# Altium PCB RADAR_D79_POWER_24V_v0.9.3.37_R10_3_37_REZONIT_IMPEDANCE_RECALC_NATIVE.PcbDoc (part 7 of 9)
Units mil, origin at the board's own origin, x right, y up, seen from the top; angles counter-clockwise.
Board outline 3110.24 x 3110.24 mil, 10 copper layers (Top Layer, RF_GND, SIG_A0, SIG_A1, PWR_A, PWR_B, SIG_B1, SIG_B0, DIGITAL_GND, Bottom Layer), stack 80.001 mil thick; 304 components, 269 nets, 1408 pads, 1372 vias.
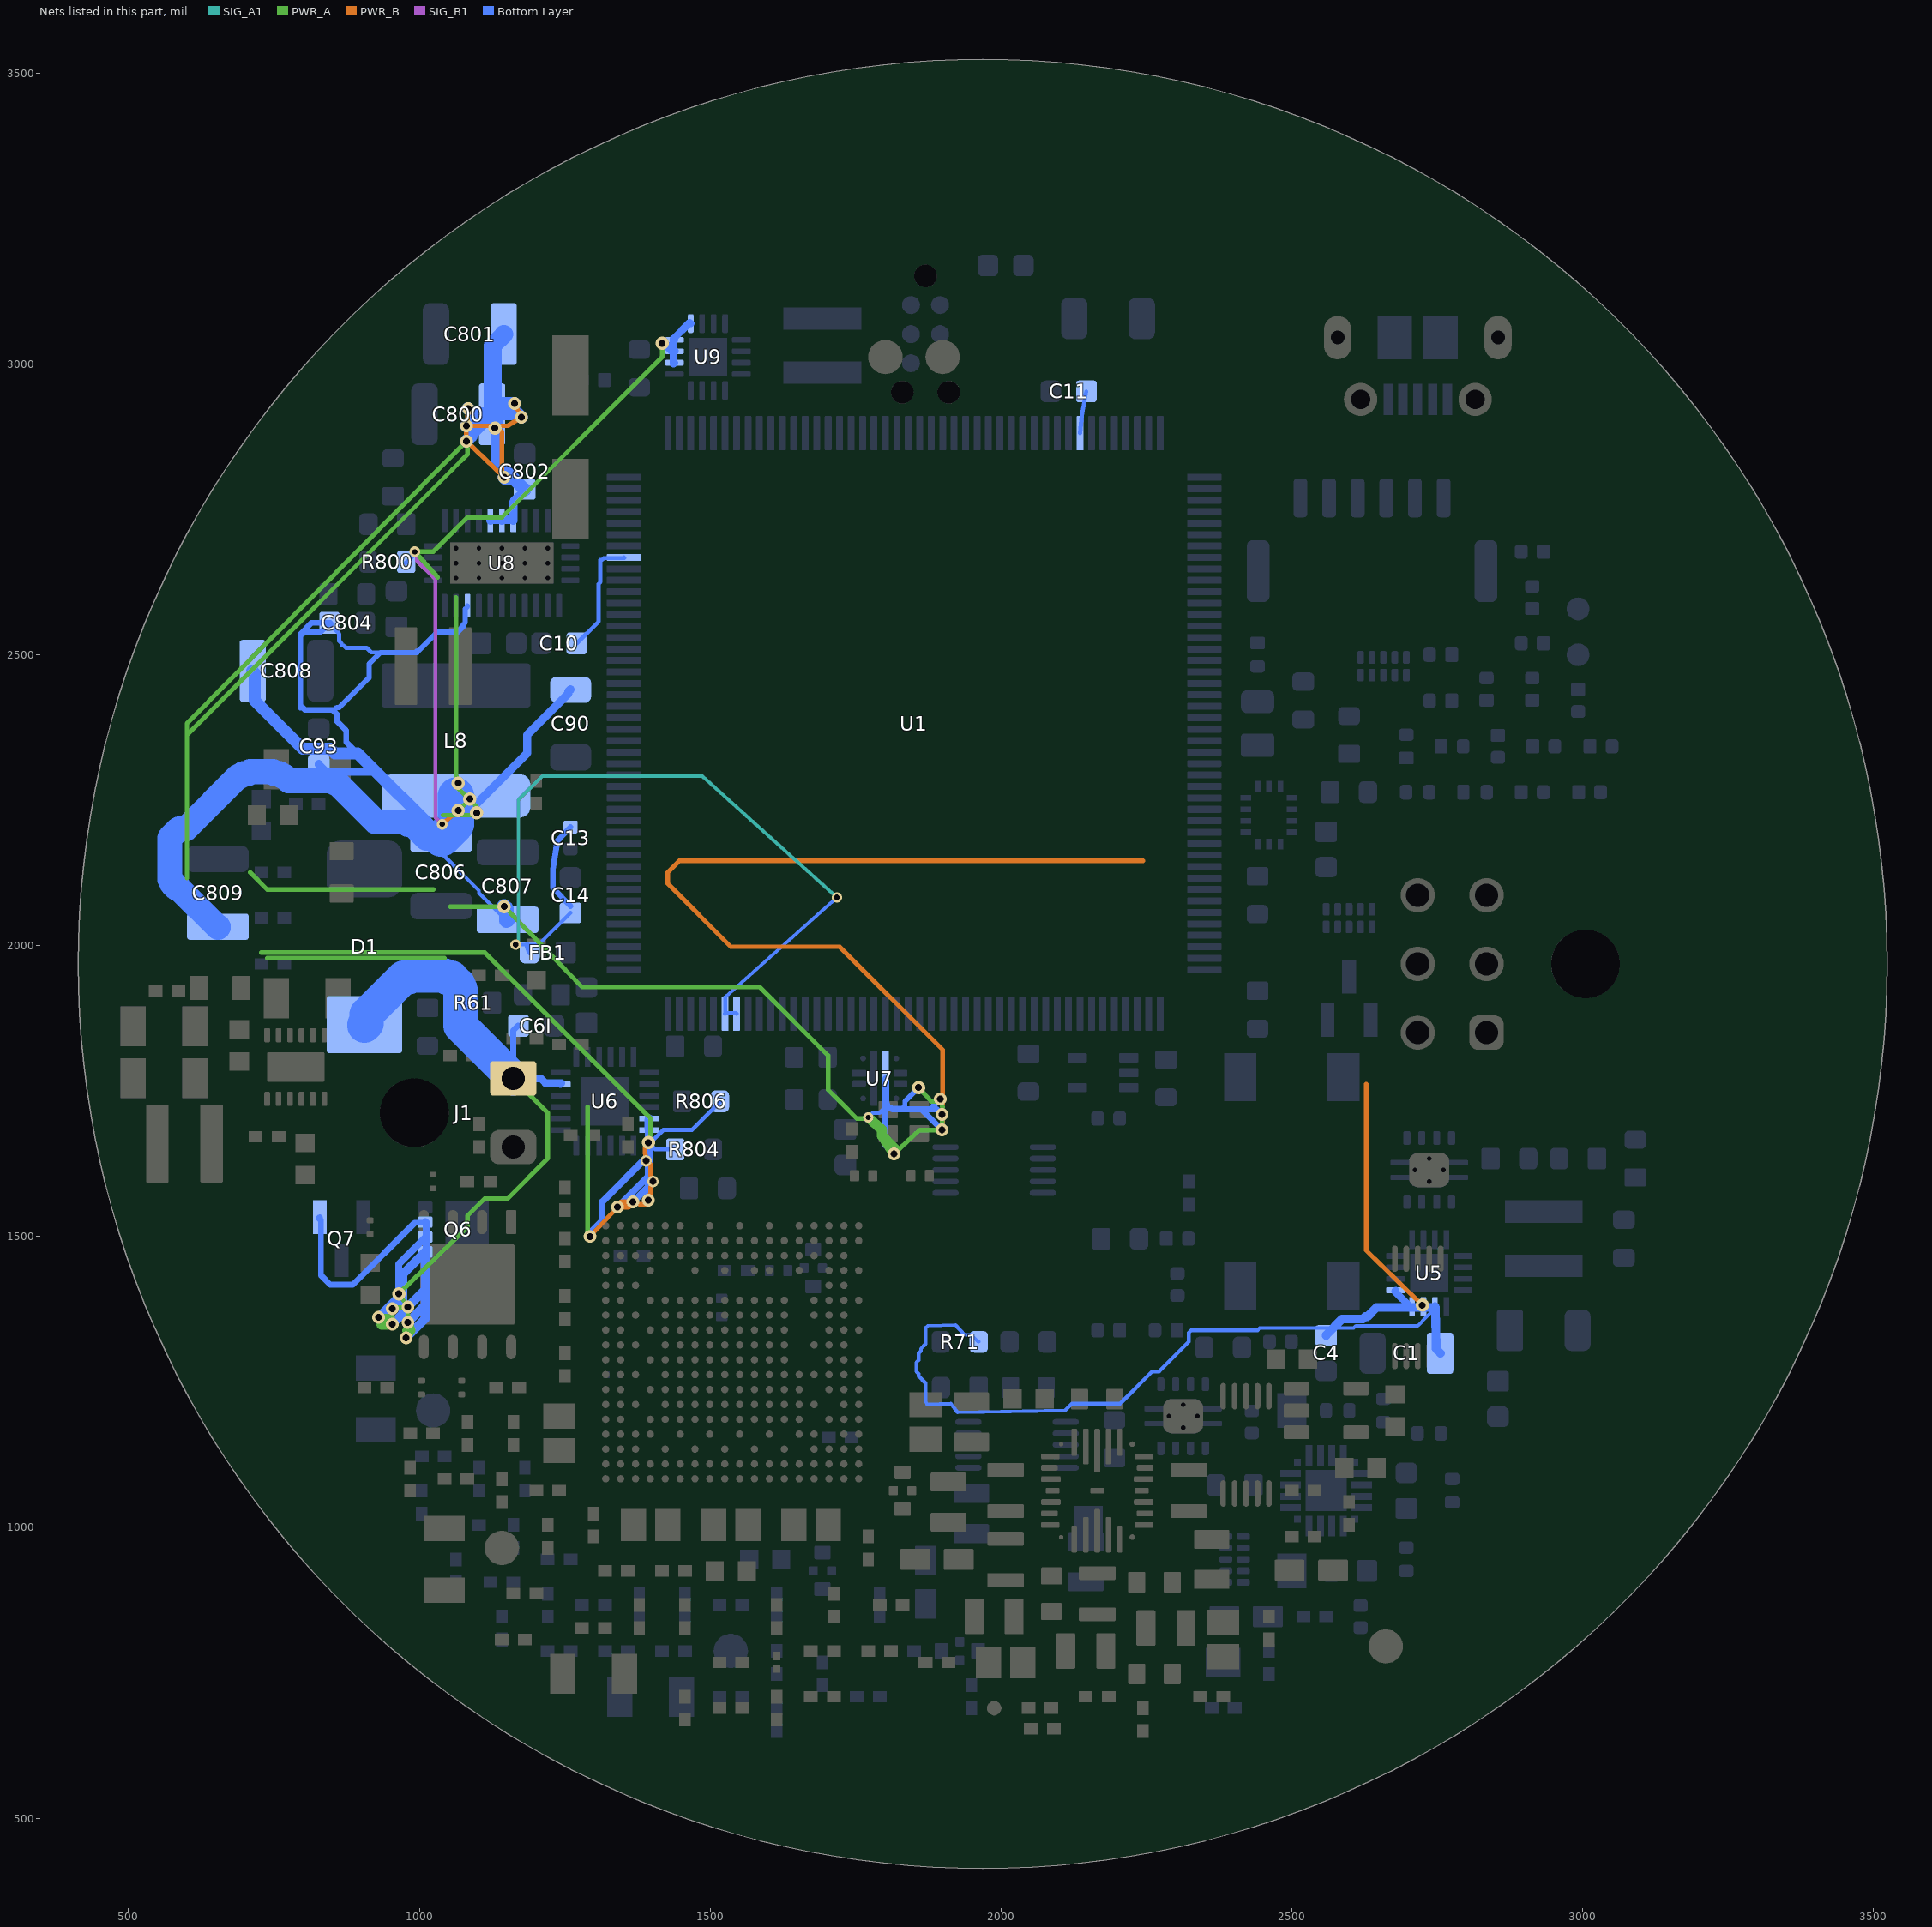
[diagram p15: the nets of this part, all layers, seen from the top]

## Via types
v1: diameter 13.77, hole 5.9, Top Layer to SIG_A0, tented both sides, 393 vias
v2: diameter 17.72, hole 9.84, Top Layer to Bottom Layer, tented both sides, 188 vias
v3: diameter 13.77/13.77/13.77 (per signal layer), hole 5.9, Top Layer to SIG_A0, tented both sides, 120 vias
v4: diameter 13.77, hole 5.9, Top Layer to SIG_A0, tented top, 104 vias
v5: diameter 19.68, hole 9.84, Top Layer to Bottom Layer, 103 vias
v6: diameter 19.68, hole 9.84, Top Layer to Bottom Layer, tented both sides, 93 vias
v7: diameter 13.78, hole 5.91, Top Layer to SIG_A0, tented both sides, 83 vias
v8: diameter 13.78, hole 5.91, SIG_B0 to Bottom Layer, tented both sides, 74 vias
v9: diameter 13.78, hole 5.91, Top Layer to SIG_A0, tented bottom, 55 vias
v10: diameter 13.78, hole 5.91, SIG_B0 to Bottom Layer, tented top, 43 vias
v11: diameter 16.54, hole 7.87, SIG_B0 to Bottom Layer, tented both sides, 22 vias
v12: diameter 22.05, hole 11.81, Top Layer to Bottom Layer, tented both sides, 17 vias
v13: diameter 17.72, hole 9.84, Top Layer to Bottom Layer, 14 vias
v14: diameter 16.54, hole 7.87, Top Layer to Bottom Layer, tented both sides, 11 vias
v15: diameter 18.11, hole 9.06, Top Layer to Bottom Layer, 7 vias
v16: diameter 22.83, hole 11.81, Top Layer to Bottom Layer, 6 vias
v17: diameter 22.05, hole 11.81, Top Layer to Bottom Layer, 6 vias
v18: diameter 22.83, hole 11.81, Top Layer to Bottom Layer, tented both sides, 5 vias
v19: diameter 17.32, hole 8.66, Top Layer to Bottom Layer, 3 vias
v20: diameter 20.47, hole 9.84, Top Layer to Bottom Layer, 3 vias
v21: diameter 16.54, hole 7.87, Top Layer to Bottom Layer, 3 vias
v22: diameter 22.05, hole 11.02, Top Layer to Bottom Layer, 2 vias
v23: diameter 19.68, hole 11.81, Top Layer to Bottom Layer, 2 vias
v24: diameter 19.68, hole 9.84, SIG_A1 to Bottom Layer, 2 vias
v25: diameter 16.54, hole 7.87, SIG_A1 to SIG_B1, tented both sides, 2 vias
v26: diameter 16.54, hole 7.87, Top Layer to SIG_A1, 2 vias
v27: diameter 13.78, hole 5.91, Top Layer to SIG_A0, 2 vias
v28: diameter 18, hole 9.84, Top Layer to Bottom Layer, tented both sides, 1 vias
v29: diameter 18.11, hole 9.06, Top Layer to Bottom Layer, tented both sides, 1 vias
v30: diameter 19.68, hole 9.84, SIG_B0 to Bottom Layer, tented both sides, 1 vias
v31: diameter 17.32, hole 7.87, Top Layer to Bottom Layer, tented both sides, 1 vias
v32: diameter 17.32, hole 7.87, SIG_A1 to Bottom Layer, tented both sides, 1 vias
v33: diameter 19.68, hole 9.84, SIG_B1 to Bottom Layer, 1 vias
v34: diameter 16.54, hole 7.87, SIG_A0 to PWR_B, tented both sides, 1 vias

## Nets (pads, with @x,y where several pads share a name; then routed paths per layer and width w, separated by ;. In a path a pad name is that pad's centre, name@x,y a point inside that pad or via, vN(x,y) a via of type N, cw(c..) or ccw(c..) an arc to the next point about the centre after c; other vN are vias at no path point) (continued)
V12_SYS: C1.1 C4.1 C90.1 C93.1 C804.1 C806.1 C807.1 C808.1 C809.1 L8.2 R71.1 R800.1 U5.10 U5.11 U5.12 U5.13 U7.5 U8.9 U9.10 U9.11 U9.12 U9.13 | length 11451.6
  PWR_A w7.87: 708.66,2125.98 738.19,2096.46 1023.62,2096.46 ; 1031.63,2633.27 v15(992.13,2677.17) 1023.62,2677.17 1043.11,2696.65 1082.68,2736.22 1141.73,2736.22 1392.27,2986.76 1417.32,3011.81 v16(1417.32,3035.43) ; 1040.56,2224.41 1092.52,2224.41 v18(1098.43,2228.35) 1102.36,2234.25 v18(1086.61,2251.97) ; 1053.15,2066.93 1086.61,2066.93 v16(1145.67,2066.93) 1186.82,2024.57 1279.53,1929.13 1584.65,1929.13 1702.76,1811.02 1702.76,1751.97 1724.27,1730.46 1751.97,1702.76 1761.81,1702.76 v15(1771.65,1704.72) 1820.87,1653.54 v17(1815.94,1641.73) 1860.24,1683.07 v12(1898.62,1683.07) v12(1898.62,1709.65) 1899.61,1722.44 v12(1895.67,1736.22) 1889.76,1732.28 1879.92,1732.28 v16(1858.27,1755.91) ; 1062.99,2598.43 1062.99,2338.03 1062.99,2293.31 v16(1066.93,2279.53) 1062.99,2273.62 v18(1086.61,2251.97) ; v18(1066.93,2232.28) v18(1086.61,2251.97)
  PWR_A w17.72: v15(1771.65,1704.72) 1795.28,1683.07 1795.28,1673.23 v17(1815.94,1641.73)
  PWR_B w7.87: v29(1039.37,2208.66) v18(1066.93,2232.28) ; v12(1898.62,1683.07) 1899.61,1692.91 1899.61,1742.08 1899.61,1820.87 1722.44,1998.03 1535.43,1998.03 1427.17,2106.3 1427.17,2125.98 1446.85,2145.67 2244.09,2145.67 ; 2627.95,1761.81 2627.95,1476.38 2682.22,1423.22 v18(2724.41,1381.89)
  SIG_B1 w7.09: v15(992.13,2677.17) 996.06,2673.23 996.06,2661.42 1027.56,2629.92 1027.56,2220.47 v29(1039.37,2208.66)
  Bottom Layer w6.3: C806.1@1037.4,2184.06 1039.37,2185.04 1039.37,2157.48 1102.36,2094.49 1102.36,2090.55 1149.61,2043.31 C807.1@1151.57,2044.29 ; R71.1@1961.61,1318.9 1960.63,1318.9 1948.82,1330.71 1937.01,1330.71 1921.59,1347.74 1874.02,1346.46 1870.08,1342.52 1870.08,1314.96 1862.2,1307.09 1862.2,1303.15 1858.27,1299.21 1858.27,1287.4 1854.33,1283.46 1854.33,1267.72 1858.27,1263.78 1858.27,1259.84 1870.08,1248.03 1870.08,1216.54 1872.96,1211.07 1913.39,1212.6 1925.2,1197.44 2110.24,1200.79 2122.05,1212.6 2204.72,1212.6 2259.84,1267.72 2271.65,1267.72 2322.83,1318.9 2322.83,1334.65 2326.77,1338.58 2440.94,1338.58 2444.88,1342.52 2606.3,1342.52 2610.24,1346.46 2716.54,1346.46 2747.09,1377.95 U5.10@2746.06,1379.43
  Bottom Layer w7.09: C804.1@845.47,2555.12 846.46,2555.12 850.39,2551.18 850.39,2547.24 862.2,2535.43 862.2,2523.62 866.14,2519.68 866.14,2515.75 870.08,2515.75 874.02,2511.81 909.45,2511.81 917.32,2503.94 992.13,2503.94 996.06,2507.87 1000,2507.87 1031.5,2539.37 1062.99,2539.37 1066.93,2543.31 1070.87,2543.31 1070.87,2547.24 1078.74,2555.12 1078.74,2578.74 1082.68,2582.68 U8.9@1082.68,2584.15 ; R800.1@977.36,2659.45 976.38,2657.48 992.13,2673.23 v15(992.13,2677.17) ; C806.1@1037.4,2184.06 1039.37,2185.04 v29(1039.37,2208.66) ; v15(1771.65,1704.72) 1779.53,1712.6 1791.34,1712.6 1799.21,1720.47 1800.32,1771.65 U7.5@1801.18,1771.65
  Bottom Layer w8.66: L8.2@1062.99,2257.48 1062.99,2255.91 1082.68,2255.91 v18(1086.61,2251.97) ; U7.5@1801.18,1771.65 1800.32,1771.65 1803.15,1767.72 1803.15,1724.41 1807.09,1720.47 1830.71,1720.47 1834.65,1724.41 1834.65,1732.28 v16(1858.27,1755.91)
  Bottom Layer w9.06: C804.1@845.47,2555.12 846.46,2555.12 830.71,2539.37 803.15,2539.37 799.21,2535.43 795.28,2535.43 795.28,2409.45 799.21,2409.45 803.15,2405.51 854.33,2405.51 858.27,2409.45 862.2,2409.45 913.39,2460.63 913.39,2484.25 933.07,2503.94 996.06,2503.94 1031.5,2539.37 1066.93,2539.37 1074.8,2547.24 1074.8,2551.18 1078.74,2555.12 1078.74,2578.74 1082.68,2582.68 U8.9@1082.68,2584.15
  Bottom Layer w9.84: C804.1@845.47,2555.12 846.46,2555.12 814.96,2555.12 795.28,2535.43 795.28,2409.45 799.21,2409.45 803.15,2405.51 850.39,2405.51 858.27,2397.64 858.27,2385.83 874.02,2370.08 874.02,2350.39 1039.37,2185.04 C806.1@1037.4,2184.06
  Bottom Layer w10.24: v17(1815.94,1641.73) 1801.18,1656.5 U7.5@1801.18,1771.65 1801.18,1730.32 1804.13,1727.36 1804.13,1724.41 1807.09,1721.46 1810.04,1721.46 1812.99,1718.5 ; v12(1895.67,1736.22) 1877.95,1718.5 1812.99,1718.5 ; v12(1898.62,1683.07) 1863.19,1718.5 1812.99,1718.5 ; v12(1898.62,1709.65) 1889.76,1718.5 1812.99,1718.5
  Bottom Layer w12.6: U9.10@1438.48,3001.97 1437.01,3000 U9.11@1437.01,3019.68 ; U9.11@1438.48,3021.65 U9.11@1437.01,3019.68 ; U9.12@1438.48,3041.34 U9.12@1437.01,3043.31 ; U9.13@1466.54,3069.39 1464.57,3070.87 U9.12@1437.01,3043.31 ; U5.13@2678.64,1407.48 2677.17,1405.51 U5.12@2704.72,1377.95 ; U5.12@2706.69,1379.43 U5.12@2704.72,1377.95 ; U5.11@2726.38,1379.43 U5.11@2728.35,1377.95 ; U5.10@2746.06,1379.43 2747.09,1377.95 U5.11@2728.35,1377.95 ; U9.11@1437.01,3019.68 U9.12@1437.01,3043.31 ; U5.12@2704.72,1377.95 U5.11@2728.35,1377.95
  Bottom Layer w14.17: C93.1@826.77,2312.01 826.77,2311.02 838.58,2299.21 925.2,2299.21 C806.1@1039.37,2185.04 ; C806.1@1037.4,2184.06 C806.1@1039.37,2185.04 ; C90.1@1259.84,2439.96 1259.84,2440.94 1255.91,2437.01 1255.91,2433.07 1185.04,2362.2 1185.04,2330.71 C806.1@1039.37,2185.04
  Bottom Layer w14.57: L8.2@1062.99,2257.48 1062.99,2255.91 1062.99,2275.59 v16(1066.93,2279.53) ; v16(1417.32,3035.43) 1421.26,3035.43 1437.01,3019.68 U9.11@1438.48,3021.65
  Bottom Layer w14.96: L8.2@1062.99,2257.48 1062.99,2255.91 1086.61,2232.28 1094.49,2232.28 v18(1098.43,2228.35) ; C4.1@2559.06,1329.72 2559.06,1330.71 2586.61,1358.27 2622.05,1358.27 2625.98,1362.2 2629.92,1362.2 2645.67,1377.95 U5.10@2747.09,1377.95 ; v18(2724.41,1381.89) 2728.35,1377.95 U5.10@2747.09,1377.95 ; U5.10@2746.06,1379.43 U5.10@2747.09,1377.95 ; C1.1@2754.92,1299.21 2755.91,1299.21 2748.03,1307.09 U5.10@2747.09,1377.95
  Bottom Layer w20.47: C808.1@713.58,2472.44 712.6,2472.44 716.54,2468.5 716.54,2421.26 799.21,2338.58 846.46,2338.58 854.33,2330.71 893.7,2330.71 1039.37,2185.04 C806.1@1037.4,2184.06
  Bottom Layer w25.59: L8.2@1062.99,2257.48 1062.99,2255.91 1062.99,2236.22 v18(1066.93,2232.28) ; v16(1145.67,2066.93) 1149.61,2062.99 1149.61,2043.31 C807.1@1151.57,2044.29
  Bottom Layer w43.31: C809.1@653.54,2032.48 653.54,2031.5 586.61,2098.43 582.68,2098.43 574.8,2106.3 574.8,2110.24 570.87,2114.17 570.87,2185.04 586.61,2200.79 598.43,2200.79 688.98,2291.34 692.91,2291.34 696.85,2295.28 704.72,2295.28 708.66,2299.21 748.03,2299.21 751.97,2295.28 759.84,2295.28 763.78,2291.34 767.72,2291.34 775.59,2283.46 850.39,2283.46 854.33,2279.53 858.27,2279.53 925.2,2212.6 976.38,2212.6 980.32,2208.66 988.19,2208.66 1011.81,2185.04 1039.37,2185.04 C806.1@1037.4,2184.06
  Bottom Layer w62.99: C806.1@1037.4,2184.06 1039.37,2185.04 1062.99,2208.66 1062.99,2255.91 L8.2@1062.99,2257.48
VCAP1_LOCAL: C10.1 U1.81 | length 207.2
  Bottom Layer w7.09: C10.1@1270.67,2519.68 1269.68,2518.7 1308.07,2557.09 1308.07,2622.05 1311.02,2625 1311.02,2663.39 1313.98,2663.39 1316.93,2666.34 1352.36,2666.34 U1.81@1351.38,2667.32
VCAP2_LOCAL: C11.1 U1.125 | length 72.7
  Bottom Layer w7.09: U1.125@2135.83,2880.91 2138.78,2911.42 C11.1@2146.65,2952.76
VDDA_FILTERED: C13.1 C14.1 FB1.2 U1.38 U1.39 | length 1492.1
  SIG_A1 w6.3: v2(1165.35,2001.57) 1170.08,2006.3 1170.08,2250.39 1211.02,2291.34 1486.61,2291.34 v2(1717.52,2082.68)
  Bottom Layer w6.3: v2(1165.35,2001.57) 1204.72,2001.57 1259.84,2056.69 C14.1@1259.84,2056.1 ; U1.39@1525.59,1882.87 1525.98,1883.46 1525.98,1911.81 v2(1717.52,2082.68)
  Bottom Layer w7.09: U1.39@1525.59,1882.87 1526.57,1883.86 1544.29,1883.86 U1.38@1545.28,1882.87
  Bottom Layer w9.84: FB1.2@1185.04,2001.57 FB1.2@1189.47,1988.19 ; C14.1@1259.84,2067.52 1229.33,2099.41 1229.33,2130.91 1237.2,2180.12 C13.1@1259.84,2203.94
VIN_PROTECTED_24V: C800.1 C801.1 C802.1 R804.1 R806.2 U6.17 U6.18 U8.20 U8.21 U8.22 | length 5751.8
  PWR_A w7.87: 728.35,1988.19 1112.2,1988.19 1385.56,1714.83 1397.64,1702.76 1397.64,1673.23 v16(1393.7,1661.42) ; 738.19,1978.35 1043.31,1978.35 ; 1289.37,1722.44 1289.37,1557.86 1289.37,1505.91 v17(1293.31,1500) ; 600.39,2116.14 600.39,2381.89 1039.16,2825.16 v12(1080.71,2867.13) 1082.68,2854.33 1082.68,2844.49 1057.03,2818.84 600.39,2362.2 600.39,2116.14
  PWR_B w7.87: v17(1083.66,2923.23) 1082.68,2913.39 1082.68,2903.54 v12(1080.71,2893.7) ; v12(1163.39,2932.09) v12(1175.2,2908.46) 1151.57,2893.7 1141.73,2893.7 v16(1129.92,2889.76) ; v17(1293.31,1500) v17(1340.55,1550.2) 1348.43,1555.12 1358.27,1555.12 v12(1367.13,1559.06) 1377.95,1555.12 1387.8,1555.12 v12(1393.7,1562.01) 1397.64,1574.8 1397.64,1584.65 v23(1401.57,1594.49) 1397.64,1604.33 1397.64,1624.02 v23(1389.76,1629.92) 1387.8,1643.7 1387.8,1653.54 v16(1393.7,1661.42) ; v12(1080.71,2893.7) 1122.05,2893.7 v16(1129.92,2889.76) ; v12(1080.71,2893.7) v12(1080.71,2867.13) v17(1145.67,2805.12) 1141.73,2814.96 1141.73,2883.86 v16(1129.92,2889.76)
  PWR_B w17.72: v17(1340.55,1550.2) 1348.43,1555.12 1358.27,1555.12 v12(1367.13,1559.06)
  Bottom Layer w7.09: R804.1@1439.96,1649.61 1405.51,1649.61 v16(1393.7,1661.42) 1395.67,1663.39 1399.61,1663.39 1419.29,1683.07 1468.5,1683.07 1517.72,1732.28 R806.2@1516.73,1732.28
  Bottom Layer w11.81: C800.1@1125,2913.39 1125.98,2913.39 1125.98,2893.7 v16(1129.92,2889.76) ; v17(1293.31,1500) 1296.26,1502.95 1296.26,1508.86 1313.98,1526.57 1313.98,1559.06 1393.7,1638.78 1393.7,1683.07 U6.18@1395.18,1683.07 ; v17(1340.55,1550.2) 1393.7,1603.35 U6.17@1393.7,1703.74 ; v12(1367.13,1559.06) 1393.7,1585.63 U6.17@1393.7,1703.74 ; v23(1389.76,1629.92) 1395.67,1635.83 1395.67,1683.07 U6.18@1395.18,1683.07 ; v12(1393.7,1562.01) U6.17@1393.7,1703.74 ; v16(1393.7,1661.42) 1393.7,1685.04 U6.18@1395.18,1683.07 ; v23(1401.57,1594.49) 1395.67,1600.39 1395.67,1702.76 U6.17@1395.18,1702.76 U6.17@1393.7,1703.74
  Bottom Layer w13.78: U8.22@1161.42,2730.81 1161.42,2732.28 1161.42,2763.78 1181.1,2783.46 C802.1@1181.1,2784.45 ; U6.18@1395.18,1683.07 1393.7,1685.04 1393.7,1700.79 U6.17@1395.18,1702.76
  Bottom Layer w14.96: U8.20@1122.05,2730.81 1122.05,2732.28 U8.21@1141.73,2732.28 ; U8.21@1141.73,2730.81 U8.21@1141.73,2732.28 ; U8.22@1161.42,2730.81 1161.42,2732.28 U8.21@1141.73,2732.28
  Bottom Layer w21.65: v12(1080.71,2867.13) 1089.57,2875.98 1089.57,2878.94 C800.1@1125,2914.37 ; v12(1080.71,2893.7) 1101.38,2914.37 C800.1@1125,2914.37 ; v17(1083.66,2923.23) 1092.52,2914.37 C800.1@1125,2914.37 ; v17(1145.67,2805.12) 1148.62,2802.17 1163.39,2802.17 C802.1@1181.1,2784.45 1181.1,2783.46 1153.54,2811.02 1149.61,2811.02 1133.86,2826.77 1133.86,2905.51 1125.98,2913.39 C800.1@1125,2913.39 C800.1@1125,2914.37 ; v12(1163.39,2932.09) 1142.72,2932.09 C800.1@1125,2914.37 ; v12(1175.2,2908.46) 1169.29,2914.37 C800.1@1125,2914.37
  Bottom Layer w31.5: C800.1@1125,2913.39 1125.98,2913.39 1125.98,3031.5 1145.67,3051.18 C801.1@1144.69,3051.18
VIN_RAW: C6I.1 D1.1 J1.1 Q6.1 Q6.2 Q6.3 Q7.2 R61.1 U6.5 | length 2773.8
  PWR_A w7.87: v12(930.12,1361.22) 935.04,1348.43 944.88,1348.43 v12(953.74,1349.41) v12(953.74,1375.98) 964.57,1377.95 974.41,1377.95 v12(980.32,1378.94) ; v12(977.36,1325.79) 974.41,1338.58 v12(980.32,1352.36) v12(980.32,1378.94) ; J1.1@1161.42,1771.65 1203.18,1729.9 1220.47,1712.6 1220.47,1633.86 1151.57,1564.96 1112.2,1564.96 1082.68,1535.43 1082.68,1515.75 1007.03,1442.62 v18(964.57,1401.57) v12(980.32,1378.94)
  PWR_A w17.72: v12(977.36,1325.79) 984.25,1338.58 v12(980.32,1352.36) ; v12(930.12,1361.22) 935.04,1358.27 944.88,1358.27 v12(953.74,1349.41) 944.88,1348.43 935.04,1348.43 v12(930.12,1361.22)
  Bottom Layer w9.84: R61.1@1060.04,1901.57 1059.06,1901.57 1094.49,1866.14 1094.49,1838.58 J1.1@1161.42,1771.65
  Bottom Layer w10.24: Q7.2@828.74,1532.97 826.77,1531.5 830.71,1527.56 830.71,1433.07 846.46,1417.32 885.83,1417.32 992.13,1523.62 1011.81,1523.62 Q6.3@1010.24,1524.8
  Bottom Layer w10.63: J1.1@1161.42,1771.65 1161.42,1854.33 1169.29,1862.2 C6I.1@1170.28,1862.2
  Bottom Layer w12.2: v18(964.57,1401.57) 964.57,1452.76 1011.81,1500 Q6.2@1010.24,1498.82
  Bottom Layer w12.6: Q6.1@1010.24,1473.62 1011.81,1472.44 Q6.2@1011.81,1500 ; Q6.2@1010.24,1498.82 Q6.2@1011.81,1500 ; Q6.3@1010.24,1524.8 1011.81,1523.62 Q6.2@1011.81,1500
  Bottom Layer w12.99: J1.1@1161.42,1771.65 1208.66,1771.65 1216.54,1763.78 1244.09,1763.78 U6.5@1242.62,1761.81
  Bottom Layer w14.96: v12(930.12,1361.22) 971.46,1402.56 971.46,1435.04 ; v12(953.74,1349.41) 971.46,1367.13 971.46,1435.04 ; v12(953.74,1375.98) 971.46,1393.7 971.46,1435.04 ; v12(977.36,1325.79) 1009.84,1358.27 Q6.1@1009.84,1473.43 ; v12(980.32,1352.36) 1009.84,1381.89 Q6.1@1009.84,1473.43 ; v12(980.32,1378.94) 1009.84,1408.46 Q6.1@1009.84,1473.43 ; Q6.1@1010.24,1473.62 Q6.1@1009.84,1473.43 ; 971.46,1435.04 Q6.1@1009.84,1473.43
  Bottom Layer w59.06: D1.1@905.51,1864.17 905.51,1862.2 909.45,1866.14 909.45,1881.89 972.44,1944.88 980.32,1944.88 984.25,1948.82 1043.31,1948.82 1047.24,1944.88 1055.12,1944.88 1066.93,1933.07 1066.93,1929.13 1070.87,1925.2 1070.87,1862.2 J1.1@1161.42,1771.65
pads on no net: D3.6 D3.7 D3.9 D3.10 D8.5 D8.6 D8.7 D8.9 D8.10 D_USB.5 D_USB.6 D_USB.7 D_USB.9 D_USB.10 J1.Un1 J6.Un1 J8.5 J8.MP J10.Un1 J10.Un2 J10.Un3 JUSB1.4 JUSB1.7 JUSB1.8 Q6.Un1 Q6.Un2 Q6.Un3 Q6.Un4 Q6.Un5 Q6.Un6 Q6.Un7 Q6.Un8 RAD_U2.11 RAD_U9.3 RAD_U11.3 RAD_U12.3 RAD_U22.3 RAD_U27.4 U1.3 U1.4 U1.5 U1.7 U1.8 U1.9 U1.10 U1.11 U1.12 U1.13 U1.16 U1.17 U1.18 U1.19 U1.20 U1.21 U1.24 U1.25 U1.26 U1.27 U1.28 U1.30 U1.32 U1.33 U1.34 U1.35 U1.41 U1.42 U1.43 U1.44 U1.45 U1.46 U1.47 U1.50 U1.51 U1.52 U1.53 U1.54 U1.55 U1.56 U1.57 U1.58 U1.59 U1.60 U1.63 U1.64 U1.65 U1.66 U1.67 U1.68 U1.69 U1.70 U1.73 U1.74 U1.75 U1.76 U1.77 U1.78 U1.83 U1.84 U1.85 U1.86 U1.87 U1.88 U1.89 U1.98 U1.99 U1.100 U1.101 U1.104 U1.105 U1.106 U1.107 U1.108 U1.109 U1.110 U1.111 U1.112 U1.115 U1.116 U1.117 U1.118 U1.119 U1.122 U1.123 U1.128 U1.129 U1.130 U1.131 U1.132 U1.133 U1.134 U1.138 U1.139 U1.140 U1.141 U1.144 U1.145 U1.146 U1.151 U1.152 U1.153 U1.154 U1.155 U1.156 U1.157 U1.160 U1.162 U1.163 U1.164 U1.165 U1.167 U1.168 U1.169 U1.170 U1.173 U1.174 U1.175 U1.176 U2.2 U2.3 U2.10 U2.11 U4.Un1 U4.Un2 U4.Un3 U4.Un4 U4.Un5 U5.7 U5.8 U5.Un1 U5.Un2 U5.Un3 U5.Un4 U6.12 U6.13 U6.19 U6.20 U6.21 U6.22 U6.23 U6.24 U6.Un1 U6.Un2 U6.Un3 U6.Un4 U7.3 U7.10 U7.Un1 U7.Un2 U7.Un3 U7.Un4 U8.7 U8.11 U8.23 U8.Un1 U8.Un2 U8.Un3 U8.Un4 U8.Un5 U8.Un6 U8.Un7 U8.Un8 U9.7 U9.8 U9.Un1 U9.Un2 U9.Un3 U9.Un4 U_CAN_RAD.Un1 U_CAN_RAD.Un2 U_CAN_RAD.Un3 U_CAN_RAD.Un4 U_CAN_RAD.Un5 U_FRAME.1 U_USB.1 U_USB.2 U_USB.10 U_USB.11 U_USB.14 U_USB.16 U_USB.19 U_USB.20 U_USB.P1 U_USB.P2 U_USB.P3 U_USB.P4 Y1.1

## Polygon pours and split planes (outlines as drawn)
TI_NetC21_2 on Top Layer "TI_NetC21_2" (solid, remove dead copper, pour order 0): 744.76,1750.23 615.47,1750.23 615.47,1558.2 737.3,1558.2 737.3,1699.8 744.76,1699.8
RADAR_12V on Top Layer "RADAR_12V" (solid, remove dead copper, pour order 1): 812.99,1930.08 748.03,1865.12 748.03,1834.07 665.45,1834.07 665.45,1968.5 812.99,1968.5
GND on Top Layer "GND" (solid, remove dead copper, pour order 2): 812.99,1756.35 598.43,1756.35 598.43,1968.5 640.28,1968.5 640.28,1814.86 812.99,1814.86
GND on Top Layer "GND_COPLANAR_FEED_REFERENCE" (solid, remove dead copper, pour order 6): 2624.02,1830.71 2624.02,1200.79 1318.9,1200.79 1318.9,1830.71
GND on Top Layer "GND_TOP_DIGITAL_RETURN" (solid, remove dead copper, pour order 7): 1141.73,748.03 2066.93,748.03 2066.93,1190.94 1141.73,1190.94
GND on SIG_B0 "GND2_REFERENCE" (solid, remove dead copper, pour order 4): 145 vertices, not listed, extent 462.6,462.6 3474.41,3474.41
GND on SIG_A0 "GND1_REFERENCE" (solid, remove dead copper, pour order 3): 96 vertices, not listed, extent 454.72,454.72 2635.41,3482.28
GND on Bottom Layer "GND_BOTTOM_RETURN" (solid, remove dead copper, pour order 5): 145 vertices, not listed, extent 462.6,462.6 3474.41,3474.41
GND on RF_GND "RF_GND_REFERENCE" (solid, remove dead copper, pour order 17): 96 vertices, not listed, extent 454.72,454.72 2635.41,3482.28
GND on DIGITAL_GND "DIGITAL_GND_REFERENCE" (solid, remove dead copper, pour order 18): 96 vertices, not listed, extent 454.72,454.72 2635.41,3482.28
TI_PVIN3V3 on PWR_A "R10_3_28_TI_PVIN3V3_19" (solid, pour order 19): 1843.82,838.63 1838.53,828.07 1872.72,810.97 1878,821.54
TI_PVIN3V3 on PWR_A "R10_3_28_TI_PVIN3V3_20" (solid, pour order 20): 1864.17,824.8 1864.17,812.99 1903.54,812.99 1903.54,824.8
TI_PVIN3V3 on PWR_A "R10_3_28_TI_PVIN3V3_21" (solid, pour order 21): 2435.34,812.62 2423.6,811.32 2425.89,790.72 2437.62,792.03
TI_PVIN3V3 on PWR_A "R10_3_28_TI_PVIN3V3_22" (solid, pour order 22): 2437.01,803.15 2425.2,803.15 2425.2,781.5 2437.01,781.5
TI_PVIN3V3 on PWR_A "R10_3_28_TI_PVIN3V3_23" (solid, pour order 23): 2434.39,795.08 2423.43,790.69 2429.78,774.8 2440.75,779.19
TI_PVIN3V3 on PWR_A "R10_3_28_TI_PVIN3V3_24" (solid, pour order 24): 1892.78,825.69 1890.84,814.04 1914.3,810.13 1916.24,821.78
TI_PVIN3V3 on PWR_A "R10_3_28_TI_PVIN3V3_25" (solid, pour order 25): 1903.54,822.83 1903.54,811.02 1954.72,811.02 1954.72,822.83
TI_PVIN3V3 on PWR_A "R10_3_28_TI_PVIN3V3_26" (solid, pour order 26): 1940.47,817.23 1948.52,808.58 1962.81,821.88 1954.77,830.53
TI_PVIN3V3 on PWR_A "R10_3_28_TI_PVIN3V3_27" (solid, pour order 27): 1921.08,823.39 1953.26,788.8 2046.05,875.11 2013.87,909.7
TI_PVIN3V3 on PWR_A "R10_3_28_TI_PVIN3V3_28" (solid, pour order 28): 2004.32,876.62 2012.36,867.97 2064.25,916.23 2056.21,924.88
TI_PVIN3V3 on PWR_A "R10_3_28_TI_PVIN3V3_29" (solid, pour order 29): 2062.55,911.48 2060.96,923.18 2040.59,920.41 2042.19,908.71
TI_PVIN3V3 on PWR_A "R10_3_28_TI_PVIN3V3_30" (solid, pour order 30): 2053.15,909.45 2053.15,921.26 2031.5,921.26 2031.5,909.45
TI_PVIN3V3 on PWR_A "R10_3_28_TI_PVIN3V3_31" (solid, pour order 31): 2037.4,907 2045.75,915.35 2027.56,933.55 2019.21,925.2
TI_PVIN3V3 on PWR_A "R10_3_28_TI_PVIN3V3_32" (solid, pour order 32): 2021.65,919.29 2033.46,919.29 2033.46,957.65 2021.65,957.65
TI_PVIN3V3 on PWR_A "R10_3_28_TI_PVIN3V3_33" (solid, pour order 33): 2003.94,928.13 2051.18,928.13 2051.18,1037.24 2003.94,1037.24
TI_PVIN3V3 on PWR_A "R10_3_28_TI_PVIN3V3_34" (solid, pour order 34): 2021.65,1007.71 2033.46,1007.71 2033.46,1049.21 2021.65,1049.21
TI_PVIN3V3 on PWR_A "R10_3_28_TI_PVIN3V3_35" (solid, pour order 35): 2019.24,1042.52 2028.35,1034.99 2054.57,1066.74 2045.47,1074.26
TI_PVIN3V3 on PWR_A "R10_3_28_TI_PVIN3V3_36" (solid, pour order 36): 2046.72,1057.61 2054.6,1066.41 2027.1,1091.02 2019.22,1082.21
TI_PVIN3V3 on PWR_A "R10_3_28_TI_PVIN3V3_37" (solid, pour order 37): 2021.65,1076.77 2033.46,1076.77 2033.46,1122.54 2021.65,1122.54
TI_PVIN3V3 on PWR_A "R10_3_28_TI_PVIN3V3_38" (solid, pour order 38): 2003.94,1093.02 2051.18,1093.02 2051.18,1175.2 2003.94,1175.2
TI_PVIN3V3 on PWR_A "R10_3_28_TI_PVIN3V3_39" (solid, pour order 39): 1994.15,1151.57 2027.56,1118.17 2070.81,1161.42 2037.4,1194.82
TI_PVIN3V3 on PWR_A "R10_3_28_TI_PVIN3V3_40" (solid, pour order 40): 2013.78,1185.04 2013.78,1137.8 2139.32,1137.8 2139.32,1185.04
TI_PVIN3V3 on PWR_A "R10_3_28_TI_PVIN3V3_41" (solid, pour order 41): 2109.79,1167.32 2109.79,1155.51 2141.73,1155.51 2141.73,1167.32
TI_PVIN3V3 on PWR_A "R10_3_28_TI_PVIN3V3_42" (solid, pour order 42): 2127.49,1160.85 2136.39,1153.09 2169.75,1191.32 2160.85,1199.08
TI_PVIN3V3 on PWR_A "R10_3_28_TI_PVIN3V3_43" (solid, pour order 43): 2169.72,1191.63 2160.54,1199.05 2137.36,1170.38 2146.55,1162.95
TI_PVIN3V3 on PWR_A "R10_3_28_TI_PVIN3V3_44" (solid, pour order 44): 2151.57,1165.35 2151.57,1177.17 2111.52,1177.17 2111.52,1165.35
TI_PVIN3V3 on PWR_A "R10_3_28_TI_PVIN3V3_45" (solid, pour order 45): 2141.05,1147.64 2141.05,1194.88 2092.52,1194.88 2092.52,1147.64
TI_PVIN3V3 on PWR_A "R10_3_28_TI_PVIN3V3_46" (solid, pour order 46): 2116.14,1137.85 2149.55,1171.26 2079.36,1241.44 2045.96,1208.04
TI_PVIN3V3 on PWR_A "R10_3_28_TI_PVIN3V3_47" (solid, pour order 47): 2079.36,1199.69 2087.72,1208.04 2047.24,1248.51 2038.89,1240.16
TI_PVIN3V3 on PWR_A "R10_3_28_TI_PVIN3V3_48" (solid, pour order 48): 2041.34,1234.25 2053.15,1234.25 2053.15,1253.94 2041.34,1253.94
TI_PVIN3V3 on PWR_A "R10_3_28_TI_PVIN3V3_49" (solid, pour order 49): 2169.72,1191.63 2160.54,1199.05 2137.36,1170.38 2146.55,1162.95
TI_PVIN3V3 on PWR_A "R10_3_28_TI_PVIN3V3_50" (solid, pour order 50): 2151.57,1177.17 2139.76,1177.17 2139.76,1131.35 2151.57,1131.35
TI_PVIN3V3 on PWR_A "R10_3_28_TI_PVIN3V3_51" (solid, pour order 51): 2169.29,1160.88 2122.05,1160.88 2122.05,1108.27 2169.29,1108.27
TI_PVIN3V3 on PWR_A "R10_3_28_TI_PVIN3V3_52" (solid, pour order 52): 2145.67,1165.3 2112.26,1131.89 2155.51,1088.64 2188.92,1122.05
TI_PVIN3V3 on PWR_A "R10_3_28_TI_PVIN3V3_53" (solid, pour order 53): 2131.89,1145.67 2131.89,1098.43 2218.5,1098.43 2218.5,1145.67
TI_PVIN3V3 on PWR_A "R10_3_28_TI_PVIN3V3_54" (solid, pour order 54): 2194.88,1155.45 2161.48,1122.05 2222.98,1060.55 2256.38,1093.95
TI_PVIN3V3 on PWR_A "R10_3_28_TI_PVIN3V3_55" (solid, pour order 55): 2222.98,1102.3 2214.63,1093.95 2234.25,1074.33 2242.6,1082.68
TI_PVIN3V3 on PWR_A "R10_3_28_TI_PVIN3V3_56" (solid, pour order 56): 2228.35,1088.58 2228.35,1076.77 2283.27,1076.77 2283.27,1088.58
TI_PVIN3V3 on PWR_A "R10_3_28_TI_PVIN3V3_57" (solid, pour order 57): 2284.98,1086.1 2273.94,1090.3 2266,1069.41 2277.04,1065.22
TI_PVIN3V3 on PWR_A "R10_3_28_TI_PVIN3V3_58" (solid, pour order 58): 2279.53,1078.74 2267.72,1078.74 2267.72,1037.4 2279.53,1037.4
TI_PVIN3V3 on PWR_A "R10_3_28_TI_PVIN3V3_59" (solid, pour order 59): 2273.62,1051.66 2265.27,1043.31 2287.06,1021.52 2295.41,1029.87
TI_PVIN3V3 on PWR_A "R10_3_28_TI_PVIN3V3_60" (solid, pour order 60): 2287.06,1063.28 2253.65,1029.87 2342.52,941 2375.93,974.41
TI_PVIN3V3 on PWR_A "R10_3_28_TI_PVIN3V3_61" (solid, pour order 61): 2366.14,998.03 2318.9,998.03 2318.9,933.36 2366.14,933.36
TI_PVIN3V3 on PWR_A "R10_3_28_TI_PVIN3V3_62" (solid, pour order 62): 2348.43,962.88 2336.61,962.88 2336.61,948.82 2348.43,948.82
TI_PVIN3V3 on PWR_A "R10_3_28_TI_PVIN3V3_63" (solid, pour order 63): 2350.87,954.72 2342.52,963.08 2314.48,935.04 2322.83,926.69
TI_PVIN3V3 on PWR_A "R10_3_28_TI_PVIN3V3_64" (solid, pour order 64): 2328.74,929.13 2328.74,940.94 2297.24,940.94 2297.24,929.13
TI_PVIN3V3 on PWR_A "R10_3_28_TI_PVIN3V3_65" (solid, pour order 65): 2307.03,927.65 2310.54,938.92 2290.41,945.19 2286.9,933.91
TI_PVIN3V3 on PWR_A "R10_3_28_TI_PVIN3V3_66" (solid, pour order 66): 2046.72,1057.61 2054.6,1066.41 2027.1,1091.02 2019.22,1082.21
TI_PVIN3V3 on PWR_A "R10_3_28_TI_PVIN3V3_67" (solid, pour order 67): 2021.65,1076.77 2033.46,1076.77 2033.46,1122.54 2021.65,1122.54
TI_PVIN3V3 on PWR_A "R10_3_28_TI_PVIN3V3_68" (solid, pour order 68): 2003.94,1093.02 2051.18,1093.02 2051.18,1175.2 2003.94,1175.2
TI_PVIN3V3 on PWR_A "R10_3_28_TI_PVIN3V3_69" (solid, pour order 69): 1994.15,1151.57 2027.56,1118.17 2070.81,1161.42 2037.4,1194.82
TI_PVIN3V3 on PWR_A "R10_3_28_TI_PVIN3V3_70" (solid, pour order 70): 2013.78,1185.04 2013.78,1137.8 2090.55,1137.8 2090.55,1185.04
TI_PVIN3V3 on PWR_A "R10_3_28_TI_PVIN3V3_71" (solid, pour order 71): 2033.52,1161.42 2066.93,1128.01 2110.18,1171.26 2076.77,1204.67
TI_PVIN3V3 on PWR_A "R10_3_28_TI_PVIN3V3_72" (solid, pour order 72): 2053.15,1147.64 2100.39,1147.64 2100.39,1224.41 2053.15,1224.41
TI_PVIN3V3 on PWR_A "R10_3_28_TI_PVIN3V3_73" (solid, pour order 73): 2076.77,1167.38 2110.18,1200.79 2047.24,1263.72 2013.84,1230.32
TI_PVIN3V3 on PWR_A "R10_3_28_TI_PVIN3V3_74" (solid, pour order 74): 2070.87,1206.69 2070.87,1253.94 1994.09,1253.94 1994.09,1206.69
TI_PVIN3V3 on PWR_A "R10_3_28_TI_PVIN3V3_75" (solid, pour order 75): 2051.12,1230.32 2017.72,1263.72 1954.78,1200.79 1988.19,1167.38
TI_PVIN3V3 on PWR_A "R10_3_28_TI_PVIN3V3_76" (solid, pour order 76): 2011.81,1177.17 2011.81,1224.41 1954.72,1224.41 1954.72,1177.17
TI_PVIN3V3 on PWR_A "R10_3_28_TI_PVIN3V3_77" (solid, pour order 77): 2011.75,1200.79 1978.35,1234.19 1883.37,1139.22 1916.78,1105.82
TI_PVIN3V3 on PWR_A "R10_3_28_TI_PVIN3V3_78" (solid, pour order 78): 1925.13,1139.22 1916.78,1147.57 1881.41,1112.2 1889.76,1103.85
TI_PVIN3V3 on PWR_A "R10_3_28_TI_PVIN3V3_79" (solid, pour order 79): 1895.67,1106.3 1895.67,1118.11 1874.02,1118.11 1874.02,1106.3
TI_PVIN3V3 on PWR_A "R10_3_28_TI_PVIN3V3_80" (solid, pour order 80): 1886.79,1107.45 1884.68,1119.07 1862.23,1114.99 1864.34,1103.37
TI_PVIN3V3 on PWR_A "R10_3_28_TI_PVIN3V3_81" (solid, pour order 81): 2300.64,943.22 2288.86,944.14 2286.96,919.77 2298.73,918.85
TI_PVIN3V3 on PWR_A "R10_3_28_TI_PVIN3V3_82" (solid, pour order 82): 2299.21,931.1 2287.4,931.1 2287.4,879.92 2299.21,879.92
TI_PVIN3V3 on PWR_A "R10_3_28_TI_PVIN3V3_83" (solid, pour order 83): 2301.66,885.83 2293.31,894.18 2279.97,880.84 2288.32,872.49
TI_PVIN3V3 on PWR_A "R10_3_28_TI_PVIN3V3_84" (solid, pour order 84): 2321.73,880.84 2288.32,914.25 2200.85,826.77 2234.25,793.37
TI_PVIN3V3 on PWR_A "R10_3_28_TI_PVIN3V3_85" (solid, pour order 85): 2257.87,803.15 2257.87,850.39 2181.1,850.39 2181.1,803.15
TI_PVIN3V3 on PWR_A "R10_3_28_TI_PVIN3V3_86" (solid, pour order 86): 2238.13,826.77 2204.72,860.18 2131.95,787.4 2165.35,754
TI_PVIN3V3 on PWR_A "R10_3_28_TI_PVIN3V3_87" (solid, pour order 87): 2188.98,811.02 2141.73,811.02 2141.73,704.72 2188.98,704.72
TI_PVIN3V3 on PWR_A "R10_3_28_TI_PVIN3V3_88" (solid, pour order 88): 2165.35,761.75 2131.95,728.35 2175.2,685.1 2208.6,718.5
TI_PVIN3V3 on PWR_A "R10_3_28_TI_PVIN3V3_89" (solid, pour order 89): 2151.57,742.13 2151.57,694.88 2326.77,694.88 2326.77,742.13
TI_PVIN3V3 on PWR_A "R10_3_28_TI_PVIN3V3_90" (solid, pour order 90): 2269.74,718.5 2303.15,685.1 2410.56,792.51 2377.16,825.92
TI_PVIN3V3 on PWR_A "R10_3_28_TI_PVIN3V3_91" (solid, pour order 91): 2368.8,792.51 2377.16,784.16 2400.08,807.09 2391.73,815.44
TI_PVIN3V3 on PWR_A "R10_3_28_TI_PVIN3V3_92" (solid, pour order 92): 2385.83,812.99 2385.83,801.18 2427.17,801.18 2427.17,812.99
TI_PVIN3V3 on PWR_A "R10_3_28_TI_PVIN3V3_93" (solid, pour order 93): 2416.04,813.61 2414.74,801.87 2435.34,799.58 2436.64,811.32
TI_PVIN3V3 on PWR_A "R10_3_28_TI_PVIN3V3_94" (solid, pour order 94): 2278.23,1090.98 2269.06,1083.55 2292.44,1054.69 2301.61,1062.12
TI_PVIN3V3 on PWR_A "R10_3_28_TI_PVIN3V3_95" (solid, pour order 95): 2299.21,1068.9 2287.4,1068.9 2287.4,1023.36 2299.21,1023.36
TI_PVIN3V3 on PWR_A "R10_3_28_TI_PVIN3V3_96" (solid, pour order 96): 2316.93,1052.89 2269.68,1052.89 2269.68,1000 2316.93,1000
TI_PVIN3V3 on PWR_A "R10_3_28_TI_PVIN3V3_97" (solid, pour order 97): 2293.31,1057.03 2259.9,1023.62 2342.52,941 2375.93,974.41
TI_PVIN3V3 on PWR_A "R10_3_28_TI_PVIN3V3_98" (solid, pour order 98): 2366.14,998.03 2318.9,998.03 2318.9,911.42 2366.14,911.42
TI_PVIN3V3 on PWR_A "R10_3_28_TI_PVIN3V3_99" (solid, pour order 99): 2375.93,935.04 2342.52,968.45 2200.85,826.77 2234.25,793.37
TI_PVIN3V3 on PWR_A "R10_3_28_TI_PVIN3V3_100" (solid, pour order 100): 2257.87,803.15 2257.87,850.39 2181.1,850.39 2181.1,803.15
TI_PVIN3V3 on PWR_A "R10_3_28_TI_PVIN3V3_101" (solid, pour order 101): 2238.13,826.77 2204.72,860.18 2131.95,787.4 2165.35,754
TI_PVIN3V3 on PWR_A "R10_3_28_TI_PVIN3V3_102" (solid, pour order 102): 2188.98,811.02 2141.73,811.02 2141.73,704.72 2188.98,704.72
TI_PVIN3V3 on PWR_A "R10_3_28_TI_PVIN3V3_103" (solid, pour order 103): 2165.35,761.75 2131.95,728.35 2175.2,685.1 2208.6,718.5
TI_PVIN3V3 on PWR_A "R10_3_28_TI_PVIN3V3_104" (solid, pour order 104): 2151.57,742.13 2151.57,694.88 2326.77,694.88 2326.77,742.13
TI_PVIN3V3 on PWR_A "R10_3_28_TI_PVIN3V3_105" (solid, pour order 105): 2269.74,718.5 2303.15,685.1 2494.04,875.98 2460.63,909.39
TI_PVIN3V3 on PWR_A "R10_3_28_TI_PVIN3V3_106" (solid, pour order 106): 2437.01,852.36 2484.25,852.36 2484.25,909.45 2437.01,909.45
TI_PVIN3V3 on PWR_A "R10_3_28_TI_PVIN3V3_107" (solid, pour order 107): 2427.22,885.83 2460.63,852.42 2523.56,915.35 2490.16,948.76
TI_PVIN3V3 on PWR_A "R10_3_28_TI_PVIN3V3_108" (solid, pour order 108): 2466.54,938.98 2466.54,891.73 2523.62,891.73 2523.62,938.98
TI_PVIN3V3 on PWR_A "R10_3_28_TI_PVIN3V3_109" (solid, pour order 109): 2466.59,915.35 2500,881.95 2553.09,935.04 2519.68,968.45
TI_PVIN3V3 on PWR_A "R10_3_28_TI_PVIN3V3_110" (solid, pour order 110): 2496.06,911.42 2543.31,911.42 2543.31,1047.24 2496.06,1047.24
TI_PVIN3V3 on PWR_A "R10_3_28_TI_PVIN3V3_111" (solid, pour order 111): 2486.28,1023.62 2519.68,990.22 2690.89,1161.42 2657.48,1194.82
TI_PVIN3V3 on PWR_A "R10_3_28_TI_PVIN3V3_112" (solid, pour order 112): 2633.86,1185.04 2633.86,1137.8 2740.16,1137.8 2740.16,1185.04
TI_PVIN3V3 on PWR_A "R10_3_28_TI_PVIN3V3_113" (solid, pour order 113): 2683.13,1161.42 2716.54,1128.01 2809,1220.47 2775.59,1253.88
TI_PVIN3V3 on PWR_A "R10_3_28_TI_PVIN3V3_114" (solid, pour order 114): 2751.97,1196.85 2799.21,1196.85 2799.21,1303.15 2751.97,1303.15
TI_PVIN3V3 on PWR_A "R10_3_28_TI_PVIN3V3_115" (solid, pour order 115): 2775.59,1246.12 2809,1279.53 2706.69,1381.83 2673.29,1348.43
TI_PVIN3V3 on PWR_A "R10_3_28_TI_PVIN3V3_116" (solid, pour order 116): 2730.32,1324.8 2730.32,1372.05 2486.22,1372.05 2486.22,1324.8
TI_PVIN3V3 on PWR_A "R10_3_28_TI_PVIN3V3_117" (solid, pour order 117): 2543.23,1347.43 2510.84,1381.82 2437.94,1313.14 2470.34,1278.76
TI_PVIN3V3 on PWR_A "R10_3_28_TI_PVIN3V3_118" (solid, pour order 118): 2479.68,1311.9 2471.58,1320.5 2420,1271.9 2428.1,1263.31
TI_1V2 on PWR_A "R10_3_28_TI_1V2_119" (solid, pour order 119): 1285.43,890.75 1285.43,880.91 1333.66,880.91 1333.66,890.75
TI_1V2 on PWR_A "R10_3_28_TI_1V2_120" (solid, pour order 120): 1328.74,892.79 1321.78,885.83 1349.41,858.2 1356.37,865.16
TI_1V2 on PWR_A "R10_3_28_TI_1V2_121" (solid, pour order 121): 1482.29,886.23 1478.93,876.98 1499.01,869.68 1502.37,878.93
TI_1V2 on PWR_A "R10_3_28_TI_1V2_122" (solid, pour order 122): 1491.14,880.91 1491.14,871.06 1579.72,871.06 1579.72,880.91
TI_1V2 on PWR_A "R10_3_28_TI_1V2_123" (solid, pour order 123): 1567.87,875.41 1575.38,869.05 1592.57,889.36 1585.05,895.72
TI_1V2 on PWR_A "R10_3_28_TI_1V2_124" (solid, pour order 124): 1296.26,1397.71 1289.3,1390.75 1348.43,1331.62 1355.38,1338.58
TI_1V2 on PWR_A "R10_3_28_TI_1V2_125" (solid, pour order 125): 1343.5,1343.5 1343.5,1333.66 1373.03,1333.66 1373.03,1343.5
TI_1V2 on PWR_A "R10_3_28_TI_1V2_126" (solid, pour order 126): 1361.4,1340.41 1366.28,1331.87 1381.71,1340.69 1376.83,1349.23
TI_1V2 on PWR_A "R10_3_28_TI_1V2_127" (solid, pour order 127): 1368.15,1343.75 1373.77,1335.67 1404.49,1357.04 1398.87,1365.12
TI_1V2 on PWR_A "R10_3_28_TI_1V2_128" (solid, pour order 128): 1393.29,1352.83 1403.07,1353.92 1401,1372.56 1391.22,1371.47
TI_1V2 on PWR_A "R10_3_28_TI_1V2_130" (solid, pour order 130): 1290.4,878.87 1297.31,885.87 1258.58,924.12 1251.67,917.12
TI_1V2 on PWR_A "R10_3_28_TI_1V2_131" (solid, pour order 131): 1258.78,892.11 1283.68,917.32 1226.74,973.56 1201.84,948.35
TI_1V2 on PWR_A "R10_3_28_TI_1V2_132" (solid, pour order 132): 1226.94,941.54 1233.85,948.55 1210.59,971.53 1203.67,964.52
TI_1V2 on PWR_A "R10_3_28_TI_1V2_133" (solid, pour order 133): 1215.55,959.65 1215.55,969.49 1195.87,969.49 1195.87,959.65
TI_1V2 on PWR_A "R10_3_28_TI_1V2_134" (solid, pour order 134): 1207.3,962.12 1203.23,971.08 1183.44,962.09 1187.52,953.13
TI_1V2 on PWR_A "R10_3_28_TI_1V2_135" (solid, pour order 135): 1189.46,952.7 1196.9,959.15 1152.07,1010.88 1144.63,1004.43
TI_1V2 on PWR_A "R10_3_28_TI_1V2_136" (solid, pour order 136): 1146.65,999.02 1156.5,999.02 1156.5,1009.3 1146.65,1009.3
TI_1V2 on PWR_A "R10_3_28_TI_1V2_137" (solid, pour order 137): 1133.86,986.67 1169.29,986.67 1169.29,1070.87 1133.86,1070.87
TI_1V2 on PWR_A "R10_3_28_TI_1V2_138" (solid, pour order 138): 1151.57,1028.09 1176.63,1053.15 1102.36,1127.42 1077.31,1102.36
TI_1V2 on PWR_A "R10_3_28_TI_1V2_139" (solid, pour order 139): 1120.08,1084.65 1120.08,1120.08 976.38,1120.08 976.38,1084.65
TI_1V2 on PWR_A "R10_3_28_TI_1V2_140" (solid, pour order 140): 1019.15,1102.36 994.09,1127.42 939.51,1072.83 964.57,1047.78
TI_1V2 on PWR_A "R10_3_28_TI_1V2_141" (solid, pour order 141): 982.28,1090.55 946.85,1090.55 946.85,1035.43 982.28,1035.43
TI_1V2 on PWR_A "R10_3_28_TI_1V2_142" (solid, pour order 142): 964.57,1078.2 939.51,1053.15 1004.25,988.41 1029.31,1013.47
TI_1V2 on PWR_A "R10_3_28_TI_1V2_143" (solid, pour order 143): 1004.25,1020.43 997.29,1013.47 1023.62,987.13 1030.58,994.09
TI_1V2 on PWR_A "R10_3_28_TI_1V2_144" (solid, pour order 144): 1028.54,999.02 1018.7,999.02 1018.7,969.49 1028.54,969.49
TI_1V2 on PWR_A "R10_3_28_TI_1V2_145" (solid, pour order 145): 1029.29,978.45 1019.58,980.07 1015.99,958.55 1025.7,956.93
TI_1V2 on PWR_A "R10_3_28_TI_1V2_146" (solid, pour order 146): 1343.97,869.51 1345.06,859.72 1363.7,861.79 1362.62,871.58
TI_1V2 on PWR_A "R10_3_28_TI_1V2_147" (solid, pour order 147): 1353.35,871.06 1353.35,861.22 1373.03,861.22 1373.03,871.06
TI_1V2 on PWR_A "R10_3_28_TI_1V2_148" (solid, pour order 148): 1361.15,866.14 1368.11,859.18 1403.57,894.64 1396.61,901.6
TI_1V2 on PWR_A "R10_3_28_TI_1V2_149" (solid, pour order 149): 1371.55,894.64 1396.61,869.58 1442.38,915.35 1417.32,940.41
TI_1V2 on PWR_A "R10_3_28_TI_1V2_150" (solid, pour order 150): 1399.61,933.07 1399.61,897.64 1454.72,897.64 1454.72,933.07
TI_1V2 on PWR_A "R10_3_28_TI_1V2_151" (solid, pour order 151): 1437.01,940.41 1411.95,915.35 1445.55,881.76 1470.61,906.81
TI_1V2 on PWR_A "R10_3_28_TI_1V2_152" (solid, pour order 152): 1445.55,913.77 1438.59,906.81 1446.85,898.55 1453.81,905.51
TI_1V2 on PWR_A "R10_3_28_TI_1V2_153" (solid, pour order 153): 1451.77,910.43 1441.93,910.43 1441.93,890.75 1451.77,890.75
TI_1V2 on PWR_A "R10_3_28_TI_1V2_154" (solid, pour order 154): 1446.85,902.63 1439.89,895.67 1466.54,869.02 1473.5,875.98
TI_1V2 on PWR_A "R10_3_28_TI_1V2_155" (solid, pour order 155): 1461.61,880.91 1461.61,871.06 1481.3,871.06 1481.3,880.91
TI_1V2 on PWR_A "R10_3_28_TI_1V2_156" (solid, pour order 156): 1469.88,878.48 1473.88,869.49 1491.73,877.42 1487.73,886.42
TI_1V2 on PWR_A "R10_3_28_TI_1V2_157" (solid, pour order 157): 1184.72,955.06 1194.54,954.41 1196.18,978.99 1186.36,979.65
TI_1V2 on PWR_A "R10_3_28_TI_1V2_158" (solid, pour order 158): 1186.02,969.49 1195.87,969.49 1195.87,1023.59 1186.02,1023.59
TI_1V2 on PWR_A "R10_3_28_TI_1V2_159" (solid, pour order 159): 1173.23,1000.95 1208.66,1000.95 1208.66,1061.02 1173.23,1061.02
TI_1V2 on PWR_A "R10_3_28_TI_1V2_160" (solid, pour order 160): 1165.89,1043.31 1190.94,1018.25 1245.53,1072.83 1220.47,1097.89
TI_1V2 on PWR_A "R10_3_28_TI_1V2_161" (solid, pour order 161): 1202.76,1055.12 1238.19,1055.12 1238.19,1195.88 1202.76,1195.88
TI_1V2 on PWR_A "R10_3_28_TI_1V2_162" (solid, pour order 162): 1215.55,1173.25 1225.39,1173.25 1225.39,1215.55 1215.55,1215.55
TI_1V2 on PWR_A "R10_3_28_TI_1V2_163" (solid, pour order 163): 1213.55,1211.36 1219.74,1203.71 1248.06,1226.63 1241.87,1234.28
TI_1V2 on PWR_A "R10_3_28_TI_1V2_164" (solid, pour order 164): 1234.19,1227.13 1241.37,1220.41 1288.47,1270.69 1281.28,1277.42
TI_1V2 on PWR_A "R10_3_28_TI_1V2_165" (solid, pour order 165): 1256.47,1269.65 1282.33,1245.42 1324.25,1290.19 1298.39,1314.41
TI_1V2 on PWR_A "R10_3_28_TI_1V2_166" (solid, pour order 166): 1281.5,1271.65 1316.93,1271.65 1316.93,1349.75 1281.5,1349.75
TI_1V2 on PWR_A "R10_3_28_TI_1V2_167" (solid, pour order 167): 1294.29,1327.11 1304.13,1327.11 1304.13,1382.87 1294.29,1382.87
TI_1V2 on PWR_A "R10_3_28_TI_1V2_168" (solid, pour order 168): 1295.52,1372.05 1305.11,1374.26 1299.95,1396.65 1290.36,1394.44
TI_3V3 on PWR_A "R10_3_28_TI_3V3_247" (solid, pour order 247): 1372.56,1062.73 1381.16,1054.64 1429.7,1106.28 1421.09,1114.37
TI_3V3 on PWR_A "R10_3_28_TI_3V3_248" (solid, pour order 248): 1387.96,1104.99 1422.39,1072.63 1460.56,1113.24 1426.13,1145.6
TI_3V3 on PWR_A "R10_3_28_TI_3V3_249" (solid, pour order 249): 1403.54,1135.83 1403.54,1088.58 1490.16,1088.58 1490.16,1135.83
TI_3V3 on PWR_A "R10_3_28_TI_3V3_250" (solid, pour order 250): 1433.13,1112.2 1466.54,1078.8 1598.37,1210.63 1564.96,1244.04
TI_3V3 on PWR_A "R10_3_28_TI_3V3_251" (solid, pour order 251): 1541.34,1234.25 1541.34,1187.01 1716.54,1187.01 1716.54,1234.25
TI_3V3 on PWR_A "R10_3_28_TI_3V3_252" (solid, pour order 252): 1659.51,1210.63 1692.91,1177.22 1785.38,1269.68 1751.97,1303.09
TI_3V3 on PWR_A "R10_3_28_TI_3V3_253" (solid, pour order 253): 1728.35,1293.31 1728.35,1246.06 1795.28,1246.06 1795.28,1293.31
TI_3V3 on PWR_A "R10_3_28_TI_3V3_254" (solid, pour order 254): 1773.47,1303.04 1738.3,1271.5 1781.59,1223.21 1816.77,1254.75
TI_3V3 on PWR_A "R10_3_28_TI_3V3_255" (solid, pour order 255): 1783.87,1264.91 1775.07,1257.02 1822.38,1204.26 1831.17,1212.14
TI_3V3 on PWR_A "R10_3_28_TI_3V3_256" (solid, pour order 256): 1823.25,1204.26 1831.18,1213.02 1781.08,1258.34 1773.15,1249.58
TI_3V3 on PWR_A "R10_3_28_TI_3V3_257" (solid, pour order 257): 1775.59,1244.09 1787.4,1244.09 1787.4,1259.21 1775.59,1259.21
TI_3V3 on PWR_A "R10_3_28_TI_3V3_258" (solid, pour order 258): 1757.87,1229.69 1805.12,1229.69 1805.12,1283.46 1757.87,1283.46
TI_3V3 on PWR_A "R10_3_28_TI_3V3_259" (solid, pour order 259): 1781.5,1226.44 1814.9,1259.84 1771.65,1303.09 1738.25,1269.68
TI_3V3 on PWR_A "R10_3_28_TI_3V3_260" (solid, pour order 260): 1795.28,1246.06 1795.28,1293.31 1718.5,1293.31 1718.5,1246.06
TI_3V3 on PWR_A "R10_3_28_TI_3V3_261" (solid, pour order 261): 1775.53,1269.68 1742.13,1303.09 1649.66,1210.63 1683.07,1177.22
TI_3V3 on PWR_A "R10_3_28_TI_3V3_262" (solid, pour order 262): 1706.69,1187.01 1706.69,1234.25 1531.5,1234.25 1531.5,1187.01
TI_3V3 on PWR_A "R10_3_28_TI_3V3_263" (solid, pour order 263): 1588.52,1210.63 1555.12,1244.04 1403.6,1092.52 1437.01,1059.11
TI_3V3 on PWR_A "R10_3_28_TI_3V3_264" (solid, pour order 264): 1460.63,1068.9 1460.63,1116.14 1403.19,1116.14 1403.19,1068.9
TI_3V3 on PWR_A "R10_3_28_TI_3V3_265" (solid, pour order 265): 1432.72,1086.61 1432.72,1098.43 1401.57,1098.43 1401.57,1086.61
TI_3V3 on PWR_A "R10_3_28_TI_3V3_266" (solid, pour order 266): 1415.82,1092.96 1407.04,1100.86 1372.57,1062.55 1381.34,1054.65
TI_PMICOUT_1V8 on PWR_A "R10_3_28_TI_PMICOUT_1V8_322" (solid, pour order 322): 2670.77,904.32 2674.42,895.18 2693.4,902.77 2689.75,911.91
TI_PMICOUT_1V8 on PWR_A "R10_3_28_TI_PMICOUT_1V8_323" (solid, pour order 323): 2682.09,910.43 2682.09,900.59 2721.46,900.59 2721.46,910.43
TI_PMICOUT_1V8 on PWR_A "R10_3_28_TI_PMICOUT_1V8_324" (solid, pour order 324): 2709.58,905.51 2716.54,898.55 2736.88,918.9 2729.92,925.85
TI_PMICOUT_1V8 on PWR_A "R10_3_28_TI_PMICOUT_1V8_325" (solid, pour order 325): 2707.65,918.9 2729.92,896.62 2837.23,1003.94 2814.96,1026.21
TI_PMICOUT_1V8 on PWR_A "R10_3_28_TI_PMICOUT_1V8_326" (solid, pour order 326): 2799.21,988.19 2830.71,988.19 2830.71,1383.86 2799.21,1383.86
TI_PMICOUT_1V8 on PWR_A "R10_3_28_TI_PMICOUT_1V8_327" (solid, pour order 327): 2814.96,1345.84 2837.23,1368.11 2618.11,1587.23 2595.84,1564.96
TI_PMICOUT_1V8 on PWR_A "R10_3_28_TI_PMICOUT_1V8_328" (solid, pour order 328): 2602.36,1549.21 2633.86,1549.21 2633.86,1787.4 2602.36,1787.4
TI_PMICOUT_1V8 on PWR_A "R10_3_28_TI_PMICOUT_1V8_329" (solid, pour order 329): 2618.11,1749.38 2640.38,1771.65 2214.57,2197.47 2192.3,2175.2
TI_PMICOUT_1V8 on PWR_A "R10_3_28_TI_PMICOUT_1V8_330" (solid, pour order 330): 2230.32,2159.45 2230.32,2190.94 816.89,2190.94 816.89,2159.45
TI_PMICOUT_1V8 on PWR_A "R10_3_28_TI_PMICOUT_1V8_331" (solid, pour order 331): 837.56,2170.28 837.56,2180.12 782.48,2180.12 782.48,2170.28
TI_PMICOUT_1V8 on PWR_A "R10_3_28_TI_PMICOUT_1V8_332" (solid, pour order 332): 791.96,2169.94 792.66,2179.76 769.06,2181.44 768.36,2171.62
V12_SYS on PWR_A "R10_3_28_V12_SYS_334" (solid, pour order 334): 1054.4,2232.28 1066.93,2219.76 1099.14,2251.97 1086.61,2264.5
V12_SYS on PWR_A "R10_3_28_V12_SYS_335" (solid, pour order 335): 1087.35,2264.47 1074.11,2252.7 1101.63,2221.75 1114.87,2233.52
V12_SYS on PWR_A "R10_3_28_V12_SYS_336" (solid, pour order 336): 1114.65,2236.71 1099.91,2246.54 1086.14,2225.89 1100.88,2216.06
V12_SYS on PWR_A "R10_3_28_V12_SYS_337" (solid, pour order 337): 1087.16,2239.45 1099.13,2252.51 1062.45,2286.14 1050.48,2273.08
V12_SYS on PWR_A "R10_3_28_V12_SYS_338" (solid, pour order 338): 1050.71,2271.17 1065.45,2261.34 1079.21,2281.98 1064.47,2291.81
V12_SYS on PWR_A "R10_3_28_V12_SYS_339" (solid, pour order 339): 1771.9,1717.25 1759.13,1704.97 1820.62,1641.02 1833.39,1653.3
V12_SYS on PWR_A "R10_3_28_V12_SYS_340" (solid, pour order 340): 1832.45,1658.31 1816.1,1665.13 1804.36,1636.96 1820.71,1630.15
V12_SYS on PWR_A "R10_3_28_V12_SYS_341" (solid, pour order 341): 1803.42,1642.16 1815.51,1629.21 1872.76,1682.64 1860.67,1695.59
V12_SYS on PWR_A "R10_3_28_V12_SYS_342" (solid, pour order 342): 1851.38,1691.93 1851.38,1674.21 1907.48,1674.21 1907.48,1691.93
V12_SYS on PWR_A "R10_3_28_V12_SYS_343" (solid, pour order 343): 1889.76,1674.21 1907.48,1674.21 1907.48,1718.5 1889.76,1718.5
V12_SYS on PWR_A "R10_3_28_V12_SYS_344" (solid, pour order 344): 1889.11,1701.49 1906.77,1700.13 1909.12,1730.59 1891.45,1731.95
V12_SYS on PWR_A "R10_3_28_V12_SYS_345" (solid, pour order 345): 1893.52,1711.49 1910.56,1716.36 1901.75,1747.17 1884.72,1742.3
V12_SYS on PWR_A "R10_3_28_V12_SYS_346" (solid, pour order 346): 1907.95,1733.76 1898.13,1748.5 1877.48,1734.74 1887.31,1720
V12_SYS on PWR_A "R10_3_28_V12_SYS_347" (solid, pour order 347): 1898.62,1723.43 1898.62,1741.14 1871.06,1741.14 1871.06,1723.43
V12_SYS on PWR_A "R10_3_28_V12_SYS_348" (solid, pour order 348): 1879.38,1719.77 1892.44,1731.74 1858.81,1768.42 1845.75,1756.45
V12_SYS on PWR_A "R10_3_28_V12_SYS_349" (solid, pour order 349): 1110.71,2225.89 1100.88,2240.63 1080.24,2226.87 1090.06,2212.13
V12_SYS on PWR_A "R10_3_28_V12_SYS_350" (solid, pour order 350): 1101.38,2215.55 1101.38,2233.27 1031.7,2233.27 1031.7,2215.55
V12_SYS on PWR_A "R10_3_28_V12_SYS_351" (solid, pour order 351): 1099.62,2165.35 1099.62,2283.46 718.5,2283.46 718.5,2165.35
V12_SYS on PWR_A "R10_3_28_V12_SYS_352" (solid, pour order 352): 861.08,2224.41 777.56,2307.93 615.3,2145.67 698.82,2062.15
V12_SYS on PWR_A "R10_3_28_V12_SYS_353" (solid, pour order 353): 698.82,2229.19 615.3,2145.67 708.66,2052.31 792.18,2135.83
V12_SYS on PWR_A "R10_3_28_V12_SYS_354" (solid, pour order 354): 767.72,2194.88 649.61,2194.88 649.61,2066.93 767.72,2066.93
V12_SYS on PWR_A "R10_3_28_V12_SYS_355" (solid, pour order 355): 708.66,2209.5 625.14,2125.98 738.19,2012.94 821.71,2096.46
V12_SYS on PWR_A "R10_3_28_V12_SYS_356" (solid, pour order 356): 679.13,2155.51 679.13,2037.4 1082.68,2037.4 1082.68,2155.51
V12_SYS on PWR_A "R10_3_28_V12_SYS_357" (solid, pour order 357): 1023.62,2179.97 940.11,2096.46 1053.15,1983.41 1136.67,2066.93
V12_SYS on PWR_A "R10_3_28_V12_SYS_358" (solid, pour order 358): 994.09,2125.98 994.09,2007.87 1145.67,2007.87 1145.67,2125.98
V12_SYS on PWR_A "R10_3_28_V12_SYS_359" (solid, pour order 359): 1077.76,2075.79 1077.76,2058.07 1154.53,2058.07 1154.53,2075.79
V12_SYS on PWR_A "R10_3_28_V12_SYS_360" (solid, pour order 360): 1060.85,2268.58 1077.88,2273.44 1069.08,2304.26 1052.04,2299.39
V12_SYS on PWR_A "R10_3_28_V12_SYS_361" (solid, pour order 361): 1054.13,2284.45 1071.85,2284.45 1071.85,2346.89 1054.13,2346.89
V12_SYS on PWR_A "R10_3_28_V12_SYS_362" (solid, pour order 362): 1003.94,2278.98 1122.05,2278.98 1122.05,2657.48 1003.94,2657.48
V12_SYS on PWR_A "R10_3_28_V12_SYS_363" (solid, pour order 363): 1058.6,2515.02 1146.39,2594.04 1036.02,2716.67 948.23,2637.66
V12_SYS on PWR_A "R10_3_28_V12_SYS_364" (solid, pour order 364): 1030.97,2620.76 1044.14,2632.61 992.78,2689.68 979.62,2677.82
V12_SYS on PWR_A "R10_3_28_V12_SYS_365" (solid, pour order 365): 983.27,2686.02 983.27,2668.31 1032.48,2668.31 1032.48,2686.02
V12_SYS on PWR_A "R10_3_28_V12_SYS_366" (solid, pour order 366): 1011.09,2677.17 1023.62,2664.64 1055.64,2696.65 1043.11,2709.18
V12_SYS on PWR_A "R10_3_28_V12_SYS_367" (solid, pour order 367): 959.59,2696.65 1043.11,2613.14 1166.19,2736.22 1082.68,2819.74
V12_SYS on PWR_A "R10_3_28_V12_SYS_368" (solid, pour order 368): 1023.62,2795.28 1023.62,2677.17 1200.79,2677.17 1200.79,2795.28
V12_SYS on PWR_A "R10_3_28_V12_SYS_369" (solid, pour order 369): 1058.22,2736.22 1141.73,2652.7 1475.78,2986.76 1392.27,3070.27
V12_SYS on PWR_A "R10_3_28_V12_SYS_370" (solid, pour order 370): 1379.74,2986.76 1392.27,2974.23 1429.85,3011.81 1417.32,3024.34
V12_SYS on PWR_A "R10_3_28_V12_SYS_371" (solid, pour order 371): 1408.46,3002.95 1426.18,3002.95 1426.18,3044.29 1408.46,3044.29
V12_SYS on PWR_A "R10_3_28_V12_SYS_372" (solid, pour order 372): 1145.85,2079.46 1133.14,2067.11 1186.64,2012.04 1199.34,2024.39